# Altium PCB EVT_SYS_CARRIER.PcbDoc (part 2 of 2)
Units mil, origin at the board's own origin, x right, y up, seen from the top; angles counter-clockwise.
Board outline 3543.31 x 2755.91 mil, 4 copper layers (Top Layer, Mid-Layer 1, Mid-Layer 2, Bottom Layer), stack 63.036 mil thick; 83 components, 54 nets, 483 pads, 241 vias.
Unrouted connection lines stored in the file: 6.
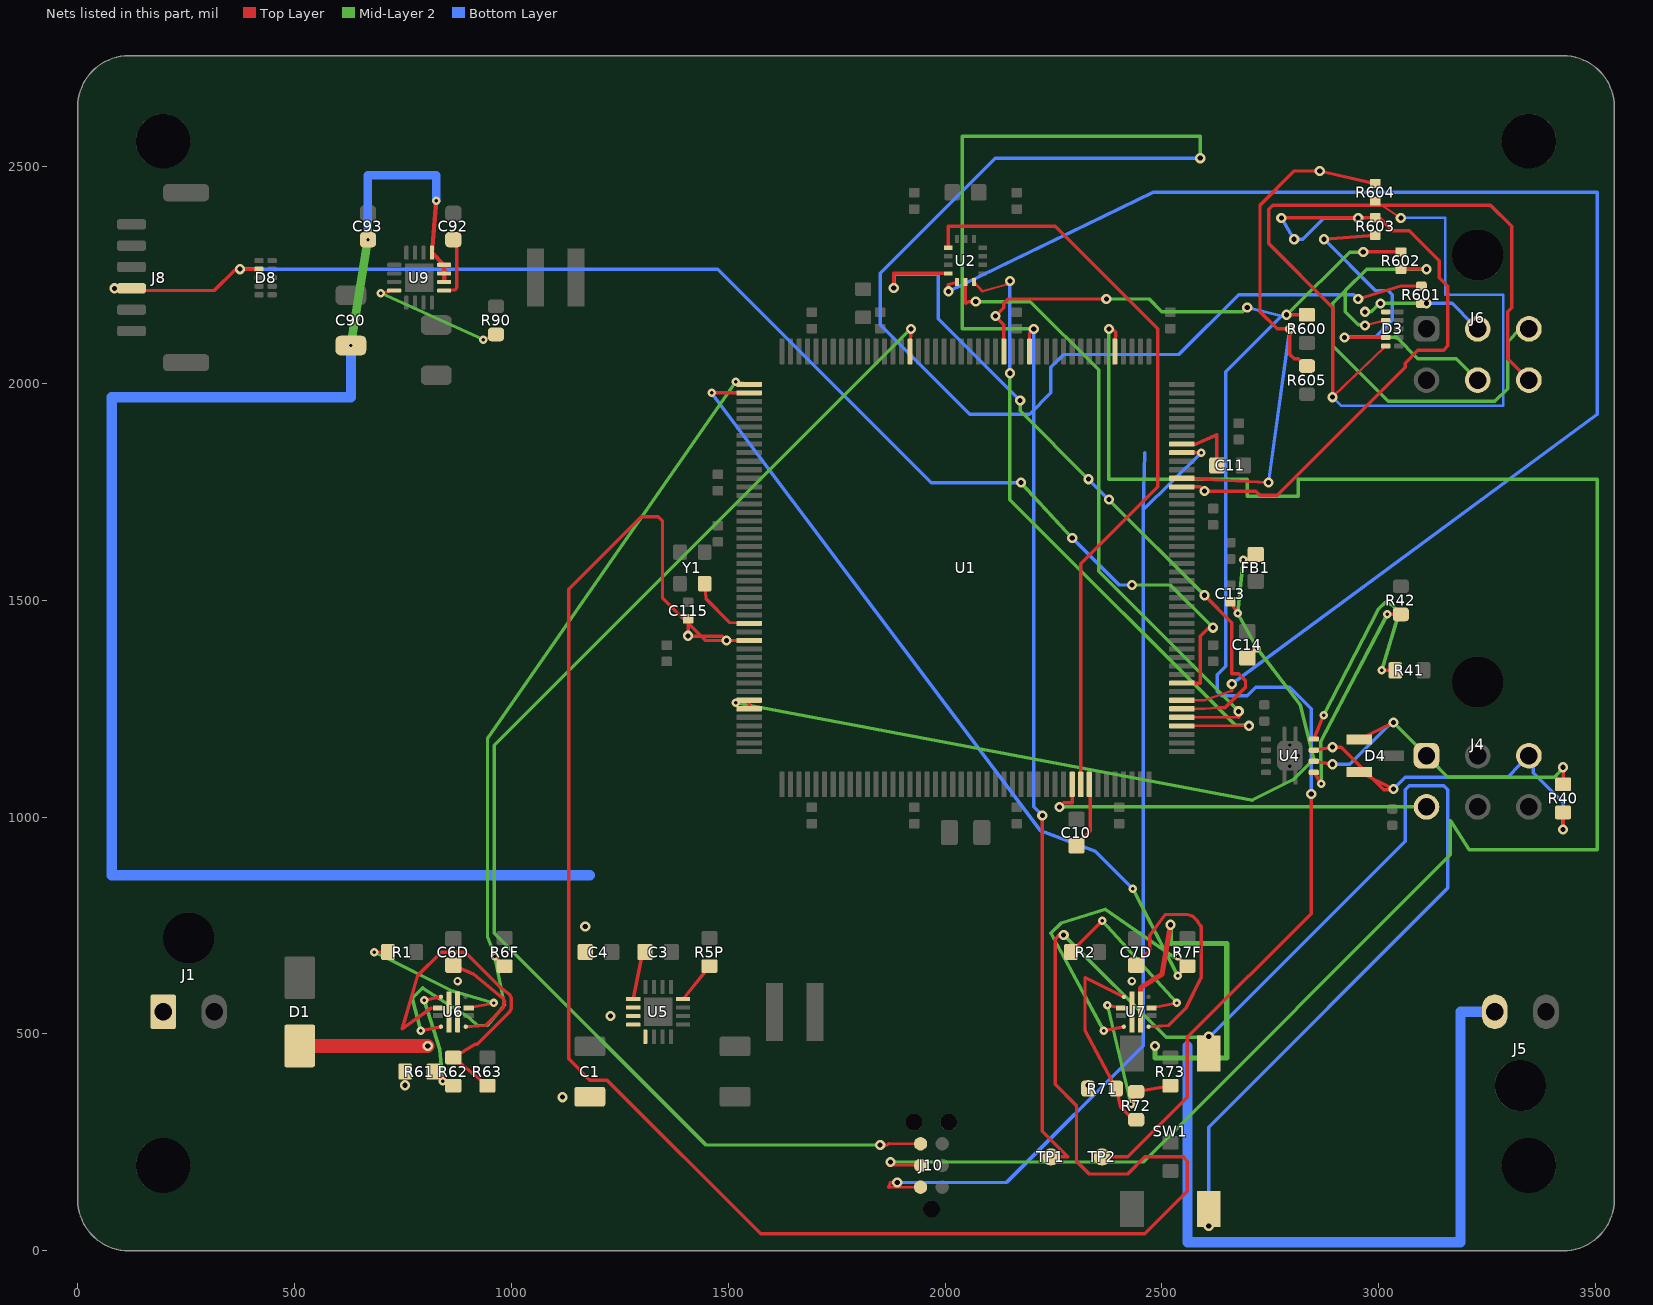
[diagram p4: the nets of this part, all layers, seen from the top]

## Via types
v1: diameter 23.62, hole 11.81, Top Layer to Bottom Layer, 103 vias
v2: diameter 15.75, hole 7.87, Top Layer to Bottom Layer, 96 vias
v3: diameter 19.68, hole 7.87, Top Layer to Bottom Layer, 33 vias
v4: diameter 19.68, hole 9.84, Top Layer to Bottom Layer, 4 vias
v5: diameter 15.75, hole 7.87, Top Layer to Mid-Layer 1, 2 vias
v6: diameter 31.5, hole 15.75, Top Layer to Bottom Layer, 2 vias
v7: diameter 11.81, hole 7.09, Top Layer to Mid-Layer 1, 1 vias

## Nets (pads, with @x,y where several pads share a name; then routed paths per layer and width w, separated by ;. In a path a pad name is that pad's centre, name@x,y a point inside that pad or via, vN(x,y) a via of type N, cw(c..) or ccw(c..) an arc to the next point about the centre after c; other vN are vias at no path point) (continued)
GNSS_TX_EXT: D8.2 J8.3 U1.97 | length 3171.7
  Top Layer w7.87: J8.3@124.02,2219.49 v1(84.65,2219.49) 98.43,2214.57 314.96,2214.57 364.17,2263.78 v1(374.02,2263.78) D8.2@417.91,2263.78 ; U1.97@2546.26,1309.06 2588.58,1309.06 2588.58,1417.32 2608.27,1437.01 v1(2618.11,1437.01)
  Mid-Layer 2 w7.87: v1(2175.2,1771.65) v1(2293.31,1643.7) ; v1(2431.1,1535.43) 2519.68,1535.43 2608.27,1446.85 v1(2618.11,1437.01)
  Bottom Layer w7.87: v1(374.02,2263.78) 383.86,2263.78 1476.38,2263.78 1968.5,1771.65 2165.35,1771.65 v1(2175.2,1771.65) ; v1(2293.31,1643.7) 2401.57,1535.43 v1(2431.1,1535.43)
HOST_UART1_RX: R600.2 R602.2 TP2.1 U1.150 | length 3629.4
  Top Layer w7.87: U1.150@2135.83,2073.82 2135.83,2086.61 2135.83,2135.83 v1(2116.14,2155.51) 2135.83,2175.2 2135.83,2185.04 2145.67,2194.88 v1(2372.05,2194.88) ; TP2.1@2362.2,216.54 2401.57,216.54 2411.42,216.54 2421.26,216.54 2559.06,354.33 2559.06,492.13 2844.49,777.56 v1(2844.49,1053.15) ; v1(2787.4,2158.46) R600.2@2834.65,2158.46 ; v1(2964.57,2303.54) R602.2@3051.18,2303.54
  Mid-Layer 2 w7.87: v1(2372.05,2194.88) 2470.47,2194.88 2500,2165.35 2687.01,2165.35 v1(2696.85,2175.2) ; v1(2787.4,2158.46) 2795.28,2165.35 2933.07,2303.15 2952.76,2303.15 v1(2964.57,2303.54)
  Bottom Layer w7.87: v1(2696.85,2175.2) 2775.59,2155.51 ; v1(2844.49,1053.15) 2844.49,1062.99 2844.49,1250 2795.28,1299.21 2716.54,1299.21 2696.85,1279.53 2637.8,1279.53 2627.95,1289.37 2627.95,1328.74 2647.64,1348.43 2647.64,2027.56 2775.59,2155.51 ; 2775.59,2155.51 v1(2787.4,2158.46) 2775.59,2155.51
HOST_UART1_RX_EXT: D3.2 J6.3 R602.1 | length 1403.1
  Top Layer w5.91: v1(2968.5,2133.86) D3.2@3016.34,2145.67 ; R602.1@3051.18,2263.39 v1(3110.24,2263.39)
  Mid-Layer 2 w7.87: v1(2968.5,2133.86) 2962.6,2135.83 2952.76,2135.83 2923.23,2165.35 2923.23,2214.57 2972.44,2263.78 ; J6.3@3336.61,2135.83 3326.77,2125.98 3297.24,2096.46 3297.24,1988.19 3267.72,1958.66 3021.65,1958.66 2893.7,2086.61 2893.7,2185.04 2972.44,2263.78 ; 2972.44,2263.78 v1@3100.39,2263.78 ; 2972.44,2263.78 v1@3100.39,2263.78 ; v1@3100.39,2263.78 v1(3110.24,2263.39) v1@3100.39,2263.78
HOST_UART1_TX: R601.2 TP1.1 U1.147 | length 5704
  Top Layer w7.87: U1.147@2194.88,2073.82 2194.88,2116.14 v1(2204.72,2125.98) ; v1(2224.41,1003.94) 2224.41,275.59 2273.62,226.38 2283.46,216.54 TP1.1@2244.09,216.54 ; v1(2952.76,2194.88) 3051.18,2224.8 R601.2@3098.43,2224.8
  Mid-Layer 2 w7.87: v1(2204.72,2125.98) 2039.37,2125.98 2039.37,2570.08 2588.58,2570.08 v1(2588.58,2519.68)
  Bottom Layer w7.87: v1(2204.72,2125.98) 2204.72,2116.14 2204.72,1023.62 2214.57,1013.78 v1(2224.41,1003.94) ; v1(2588.58,2519.68) 2116.14,2519.68 1850.39,2253.94 1850.39,2135.83 2057.09,1929.13 2194.88,1929.13 2244.09,1978.35 2244.09,2037.4 2273.62,2066.93 2539.37,2066.93 2677.17,2204.72 2942.91,2204.72 v1(2952.76,2194.88)
HOST_UART1_TX_EXT: D3.1 J6.2 R601.1 | length 289.6
  Top Layer w7.87: R601.1@3098.43,2184.65 v1(3110.24,2185.04)
  Mid-Layer 2 w7.87: v1(2968.5,2165.35) 2982.28,2165.35 2992.13,2175.2 v1(3003.94,2184.65) 3011.81,2185.04 v1(3110.24,2185.04)
  Bottom Layer w7.87: v1(3110.24,2185.04) 3169.29,2185.04 J6.2@3218.5,2135.83
HOST_UART2_RX: R604.2 R605.2 U1.121 | length 1299.4
  Top Layer w7.87: U1.121@2546.26,1781.5 v1(2746.06,1771.65) ; R605.2@2834.65,2040.35 2824.8,2047.24 2814.96,2057.09 2805.12,2057.09 2795.28,2066.93 2795.28,2116.14 v1(2795.28,2125.98) 2785.43,2125.98 2765.75,2125.98 2726.38,2165.35 2726.38,2411.42 2805.12,2490.16 2854.33,2490.16 v1(2864.17,2490.16) R604.2@2992.13,2461.02
  Bottom Layer w7.87: v1(2746.06,1771.65) v1(2795.28,2125.98)
HOST_UART2_RX_EXT: D3.5 J6.6 R604.1 | length 2770.7
  Top Layer w5.91: v1(2893.7,1968.5) D3.5@3016.34,2086.61 ; R604.1@2992.13,2420.87 v1(3051.18,2381.89)
  Top Layer w7.87: v1(2893.7,1968.5) 2893.7,1978.35 2893.7,2175.2 2746.06,2322.83 2746.06,2401.57 2755.91,2411.42 3257.87,2411.42 3307.09,2362.2 3307.09,2175.2 3297.24,2165.35 3297.24,2057.09 3336.61,2017.72 J6.6@3346.46,2007.87
  Bottom Layer w5.91: v1(2893.7,1968.5) 2913.39,1948.82 3153.54,1948.82 3287.4,1948.82 3287.4,2204.72 3153.54,2204.72 3153.54,2381.89 v1(3051.18,2381.89)
HOST_UART2_TX: R603.2 U1.120 | length 1644.5
  Top Layer w7.87: U1.120@2546.26,1761.81 2588.58,1761.81 v1(2598.43,1751.97) 2608.27,1751.97 2716.54,1751.97 2726.38,1742.13 2765.75,1742.13 3061.02,2037.4 3061.02,2047.24 3090.55,2076.77 3149.61,2076.77 3159.45,2086.61 3159.45,2224.41 3139.76,2244.09 3139.76,2283.46 3070.87,2352.36 3031.5,2352.36 3001.97,2381.89 2785.43,2381.89 v1(2775.59,2381.89) ; v1(2952.76,2381.89) R603.2@2992.13,2382.28
  Bottom Layer w7.87: v1(2775.59,2381.89) v1(2805.12,2332.68) 2814.96,2332.68 2824.8,2332.68 2874.02,2381.89 2942.91,2381.89 v1(2952.76,2381.89)
HOST_UART2_TX_EXT: D3.4 J6.5 R603.1 | length 943.6
  Top Layer w7.87: v1(2874.02,2332.68) R603.1@2992.13,2342.13 ; v1(2921.26,2106.3) D3.4@3016.34,2106.3
  Mid-Layer 2 w7.87: v1(2921.26,2106.3) 2933.07,2106.3 3041.34,2106.3 3090.55,2057.09 3179.13,2057.09 3208.66,2027.56 J6.5@3218.5,2017.72
  Bottom Layer w7.87: v1(2874.02,2332.68) 2992.13,2214.57 3021.65,2214.57 3031.5,2204.72 3031.5,2145.67 2992.13,2106.3 2933.07,2106.3 v1(2921.26,2106.3)
IMU_DRDY: U1.80 U2.4 | length 1752.9
  Top Layer w7.87: U2.4@2007.87,2312.99 2007.87,2362.2 2253.94,2362.2 2490.16,2125.98 2490.16,1761.81 2312.99,1584.65 U1.80@2312.99,1075.79
IMU_MISO: U1.94 U2.1 | length 1714.6
  Top Layer w5.91: U1.94@2546.26,1250 2598.43,1250 2629.92,1251.97
  Top Layer w7.87: v1(1881.89,2220.47) 1881.89,2253.94 U2.1@2007.38,2253.94 ; v1(2598.43,1511.81) 2661.42,1448.82 2661.42,1330.71 2677.17,1330.71 2692.91,1314.96 2692.91,1299.21 2645.67,1251.97 2629.92,1251.97
  Mid-Layer 2 w7.87: v1(2173.23,1960.63) 2173.23,1937.01 v1(2330.71,1779.53) ; v1(2377.95,1732.28) v1(2598.43,1511.81)
  Bottom Layer w7.87: v1(1881.89,2220.47) 1881.89,2251.97 1984.25,2251.97 1984.25,2181.1 1984.25,2149.61 v1(2173.23,1960.63) ; v1(2330.71,1779.53) v1(2377.95,1732.28)
IMU_MOSI: U1.95 U2.14 | length 3278.1
  Top Layer w5.91: U1.95@2546.26,1269.68 2598.43,1269.68 2661.42,1291.34
  Top Layer w7.87: v1(2007.87,2212.6) 2007.87,2228.35 U2.14@2027.56,2233.76 ; 2661.42,1291.34 v1(2661.42,1307.09)
  Bottom Layer w7.87: v1(2007.87,2212.6) 2480.32,2440.94 3307.09,2440.94 3503.94,2440.94 3503.94,1929.13 v1(2661.42,1307.09)
IMU_NSS: U1.92 U2.12 | length 1522.3
  Top Layer w5.91: U2.12@2066.93,2233.76 2086.61,2212.6 v1@2141.73,2228.35 ; U1.92@2546.26,1210.63 2598.43,1210.63 v1(2700.79,1210.63)
  Top Layer w7.87: v1@2141.73,2228.35 v1(2149.61,2236.22)
  Mid-Layer 2 w7.87: v1(2149.61,2023.62) 2149.61,1732.28 2669.29,1212.6 v1@2700.79,1212.6
  Bottom Layer w7.87: v1(2149.61,2023.62) v1(2149.61,2236.22)
IMU_SCK: U1.93 U2.13 | length 1487.8
  Top Layer w5.91: U1.93@2546.26,1230.31 2598.43,1230.32 2677.17,1230.32
  Top Layer w7.87: U2.13@2047.24,2233.76 2047.24,2185.04 2055.12,2188.98 v1(2070.87,2188.98) ; 2677.17,1230.32 v1(2677.17,1244.09)
  Mid-Layer 2 w7.87: v1(2070.87,2188.98) 2196.85,2188.98 2354.33,2031.5 2354.33,1566.93 v1(2677.17,1244.09)
MCU_HSE_25M: U1.29 Y1.3 | length 156.9
  Top Layer w7.87: Y1.3@1445.87,1538.39 1448.82,1503.94 1503.94,1448.82 U1.29@1548.23,1446.85
NRST: C115.1 SW1.1 U1.31 | length 7001.4
  Top Layer w7.87: C115.1@1407.48,1457.48 v1(1407.48,1418.11) 1417.32,1417.32 1486.22,1417.32 v1(1496.06,1407.48) ; U1.31@1548.23,1407.48 v1(1496.06,1407.48) ; v1(2273.62,728.35) 2263.78,728.35 2253.94,718.5 2253.94,383.86 2303.15,334.65 2303.15,206.69 2332.68,177.17 2421.26,177.17 2460.63,216.54 2549.21,216.54 2559.06,206.69 2559.06,137.8 2460.63,39.37 1574.8,39.37 1220.47,393.7 1181.1,393.7 1131.89,442.91 1131.89,1525.59 1299.21,1692.91 1338.58,1692.91 1348.43,1683.07 1348.43,1505.91 1446.85,1407.48 1486.22,1407.48 v1(1496.06,1407.48)
  Mid-Layer 2 w7.87: v1(2273.62,728.35) 2509.84,492.13 2598.43,492.13 v1(2608.27,494.09)
  Bottom Layer w7.87: v1(2608.27,57.09) 2608.27,68.9 2608.27,285.43 3159.45,836.61 3159.45,1062.99 3149.61,1072.83 3070.87,1072.83 3061.02,1062.99 3061.02,944.88 2618.11,501.97 v1(2608.27,494.09)
RADAR_12V: J5.1 U7.6 | length 2505
  Top Layer w11.81: 2450.79,598.43 2450.79,606.3 2500,637.8 v1(2519.68,751.97)
  Mid-Layer 2 w11.81: v1(2484.25,472.44) 2484.25,444.88 2649.61,444.88 2649.61,708.66 2519.68,708.66 v1(2519.68,751.97)
  Bottom Layer w23.62: 2559.06,472.44 2559.06,19.68 3188.98,19.68 3188.98,551.18 J5.1@3267.72,551.18
RADAR_CANH: D4.1 J4.3 R40.1 U4.7 | length 899.8
  Top Layer w7.87: U4.7@2850.39,1154.53 v1(2893.7,1161.42) 2903.54,1161.42 2913.39,1161.42 3011.81,1062.99 3021.65,1062.99 v1(3033.96,1064.96) D4.1@2955.22,1104.33 ; v1(3425.2,971.46) R40.1@3425.2,1010.83
  Mid-Layer 2 w7.87: J4.3@3336.61,1131.89 J4.3@3346.46,1141.73
  Bottom Layer w7.87: v1(3033.96,1064.96) 3041.34,1072.83 3061.02,1092.52 3297.24,1092.52 3326.77,1122.05 J4.3@3336.61,1131.89 ; J4.3@3346.46,1141.73 3356.3,1131.89 3356.3,1122.05 3356.3,1102.36 3425.2,1033.46 3425.2,984.25 v1(3425.2,971.46)
RADAR_CANL: D4.2 J4.1 R40.2 U4.6 | length 804.5
  Top Layer w7.87: U4.6@2850.39,1128.94 v1(2893.7,1122.05) ; D4.2@2955.22,1179.13 v1(3033.96,1218.5) ; R40.2@3425.2,1075.79 v1(3425.2,1115.16)
  Mid-Layer 2 w7.87: v1(3033.96,1218.5) 3041.34,1210.63 3100.39,1151.57 J4.1@3110.24,1141.73 3120.08,1131.89 3159.45,1092.52 3405.51,1092.52 3415.35,1102.36 v1(3425.2,1115.16)
  Bottom Layer w7.87: v1(2893.7,1122.05) 2903.54,1122.05 2933.07,1122.05 3021.65,1210.63 v1(3033.96,1218.5)
RADAR_EFUSE_FLT: R7F.1 U1.2 U7.4 | length 2540.6
  Top Layer w7.87: v3(1461.61,1978.35) U1.2@1548.23,1978.35 ; v3(2366.06,507.52) U7.4@2412.4,516.73 ; v3(2536.77,634.21) R7F.1@2559.06,656.5 v3(2536.77,678.78)
  Mid-Layer 2 w7.87: v3(2366.06,507.52) 2244.09,732.28 2267.72,755.91 2370.08,787.4 2527.56,677.17 v3(2536.77,678.78) ; v3(2433.07,834.65) v3(2536.77,634.21)
  Bottom Layer w7.87: v3(1461.61,1978.35) 2220.47,968.5 2346.46,921.26 v3(2433.07,834.65)
RADAR_REF: J4.4 U1.79 | length 922.4
  Top Layer w7.87: v1(2263.78,1023.62) 2273.62,1033.46 2293.31,1033.46 U1.79@2293.31,1075.79
  Mid-Layer 2 w7.87: v1(2263.78,1023.62) 3090.55,1023.62 3100.39,1023.62 J4.4@3100.39,1013.78
SHDN_PD: R42.1 U4.5 | length 491
  Top Layer w7.87: U4.5@2850.39,1103.35 v3(2867.87,1077.17) ; v3(3019.68,1467.52) R42.1@3051.18,1467.52
  Mid-Layer 2 w7.87: v3(2867.87,1077.17) 2866.14,1173.23 v3(3019.68,1467.52)
STB_PD: R41.1 U4.8 | length 569
  Top Layer w7.87: U4.8@2850.39,1180.12 v3(2872.99,1234.68) ; v3(3006.89,1338.58) R41.1@3038.39,1338.58
  Mid-Layer 2 w7.87: v3(2872.99,1234.68) 3000,1480.32 3015.75,1496.06 3031.5,1488.19 3047.24,1472.44 v3(3006.89,1338.58)
SWCLK: J10.4 U1.137 | length 4589.7
  Top Layer w5.91: v1@1870.08,196.85 J10.4@1943.5,196.85
  Top Layer w7.87: v1@1870.08,196.85 v1(1874.02,204.72) ; v1(2377.95,2125.98) 2385.83,2125.98 2393.7,2118.11 U1.137@2391.73,2073.82
  Mid-Layer 2 w7.87: v1(1874.02,204.72) 2456.69,204.72 3165.35,913.39 3165.35,992.13 3208.66,925.2 3503.94,925.2 3503.94,1779.53 2814.96,1779.53 2814.96,1740.16 2696.85,1740.16 2696.85,1779.53 2377.95,1779.53 v1(2377.95,2125.98)
SWDIO: J10.2 U1.124 | length 2530.2
  Top Layer w5.91: 1870.08,146.85 J10.2@1943.5,146.85
  Top Layer w7.87: 1870.08,146.85 1874.02,157.48 v1(1889.76,157.48) ; U1.124@2546.26,1840.55 v3(2590.55,1840.55)
  Bottom Layer w7.87: v1(1889.76,157.48) 2141.73,157.48 2456.69,472.44 2456.69,1708.66 ; v3(2590.55,1840.55) 2456.69,1708.66 ; 2456.69,1708.66 2460.63,1840.55 2456.69,1708.66
SWO: J10.6 U1.161 | length 3029.8
  Top Layer w5.91: 1870.08,246.85 J10.6@1943.5,246.85
  Top Layer w7.87: v1(1850.39,244.09) 1866.14,244.09 1870.08,246.85 ; U1.161@1919.29,2073.82 1921.26,2118.11 v1(1921.26,2125.98)
  Mid-Layer 2 w7.87: v1(1850.39,244.09) 1448.82,244.09 960.63,732.28 960.63,1165.35 v1(1921.26,2125.98)
SYS_EFUSE_FLT: R6F.1 U1.1 U6.4 | length 2081.8
  Top Layer w7.87: v3(791.26,507.52) U6.4@837.6,516.73 ; v3(961.97,678.78) R6F.1@984.25,656.5 ; v3(1517.32,2004.17) U1.1@1548.23,1998.03
  Mid-Layer 2 w7.87: v3(791.26,507.52) 771.65,582.68 795.28,606.3 905.51,535.43 921.26,519.68 944.88,519.68 984.25,566.93 v3(961.97,678.78) 944.88,724.41 944.88,1181.1 v3(1517.32,2004.17)
U5_PG: R5P.1 U5.4 | length 97
  Top Layer w7.87: U5.4@1396.16,580.71 R5P.1@1456.69,656.5
U5_SS_LOCAL: C3.1 U5.9 | length 112.4
  Top Layer w7.87: U5.9@1281,580.71 1299.21,673.23 C3.1@1308.07,688.98
U6_DVDT: C6D.1 U6.7 | length 265.3
  Top Layer w7.87: C6D.1@866.14,658.46 913.39,637.8 980.32,582.68 984.25,574.8 980.32,559.06 940.94,519.68 U6.7@894.68,516.73
U6_ILIM_LOCAL: R1.1 U6.9 | length 391
  Top Layer w7.87: v3(684.06,688.98) R1.1@715.55,688.98 ; U6.9@901.57,560.04 v3(959.49,571.57)
  Mid-Layer 2 w7.87: v3(684.06,688.98) 866.14,598.43 v3(959.49,571.57)
U6_OVLO_LOCAL: R62.2 R63.1 U6.2 | length 797.7
  Top Layer w7.87: 815.35,560.04 748.03,511.81 783.46,633.86 838.58,688.98 893.7,688.98 972.44,610.24 996.06,590.55 1000,582.68 1000,559.06 996.06,551.18 921.26,476.38 917.32,476.38 R62.2@866.14,445.87 R63.1@944.88,380.91
U6_UVLO_LOCAL: R61.2 R62.1 U6.1 | length 320.1
  Top Layer w7.87: v3(798.98,577.95) U6.1@837.6,585.63 ; v3(842.17,391.1) R61.2@819.88,413.39 R62.1@866.14,380.91
  Mid-Layer 2 w7.87: v3(798.98,577.95) 834.65,464.57 v3(842.17,391.1)
U7_DVDT: C7D.1 U7.7 | length 535.9
  Top Layer w7.87: C7D.1@2440.94,658.46 2440.94,661.42 2472.44,692.91 2472.44,728.35 2507.87,775.59 2559.06,775.59 2570.87,771.65 2582.68,759.84 2590.55,748.03 2590.55,629.92 2555.12,559.06 2515.75,519.68 U7.7@2469.49,516.73
U7_ILIM_LOCAL: R2.1 U7.9 | length 417.2
  Top Layer w7.87: R2.1@2290.35,688.98 v3(2362.72,761.34) ; U7.9@2476.38,560.04 v3(2534.29,571.57)
  Mid-Layer 2 w7.87: v3(2362.72,761.34) v3(2534.29,571.57)
U7_OVLO_LOCAL: R72.2 R73.1 U7.2 | length 377.5
  Top Layer w7.87: v3(2374.61,566.18) U7.2@2405.51,560.04 ; v3(2428.9,338.03) R72.2@2440.94,367.13 R73.1@2519.68,380.91
  Mid-Layer 2 w7.87: v3(2374.61,566.18) v3(2428.9,338.03)
U7_UVLO_LOCAL: R71.2 R72.1 U7.1 | length 464.7
  Top Layer w7.87: U7.1@2412.4,585.63 2322.83,629.92 2322.83,507.87 R71.2@2394.68,374.02 2405.51,330.71 2429.13,307.09 R72.1@2440.94,302.17
U9_PG: R90.1 U9.4 | length 322.7
  Top Layer w7.87: v3(698.94,2208.43) U9.4@729.82,2214.57 ; v3(935.47,2101.14) R90.1@964.57,2113.19
  Mid-Layer 2 w7.87: v3(698.94,2208.43) v3(935.47,2101.14)
U9_SS_LOCAL: C92.1 U9.9 | length 144.2
  Top Layer w7.87: U9.9@844.98,2214.57 870.08,2216.54 874.02,2220.47 874.02,2318.9 C92.1@866.14,2331.69
VCAP1_LOCAL: C10.1 U1.81 | length 155.2
  Top Layer w7.87: C10.1@2303.15,934.06 2303.15,937.01 2334.65,968.5 2334.65,1070.87 U1.81@2332.68,1075.79
VCAP2_LOCAL: C11.1 U1.125 | length 156.2
  Top Layer w7.87: U1.125@2546.26,1860.24 2578.74,1860.24 2626.97,1881.89 C11.1@2626.97,1811.02
VDDA_FILTERED: C13.1 C14.1 FB1.2 U1.38 U1.39 | length 2040
  Top Layer w7.87: v3(1517.32,1263.54) U1.38@1548.23,1269.68 U1.39@1548.23,1250 ; C13.1@2657.48,1496.85 v3(2674.96,1470.67) ; v3(2687.44,1593.74) FB1.2@2716.54,1605.81 ; C14.1@2696.85,1367.13 v3(2719.13,1389.41)
  Mid-Layer 2 w7.87: v3(1517.32,1263.54) 2708.66,1039.37 2803.15,1086.61 2818.9,1102.36 2850.39,1133.86 2818.9,1259.84 v3(2719.13,1389.41) v3(2674.96,1470.67) v3(2687.44,1593.74)
VIN_PROTECTED: C1.1 C4.1 C90.1 C93.1 R71.1 U5.10 U5.11 U5.12 U5.13 U6.6 U7.5 U9.10 U9.11 U9.12 U9.13 | length 3686.4
  Top Layer w9.84: v3(826.77,2421.26) U9.13@816.93,2301.67 U9.12@844.98,2273.62 U9.10@844.98,2234.25
  Mid-Layer 2 w19.68: v3(629.92,2087.6) v3(669.29,2331.69)
  Bottom Layer w19.68: v3(669.29,2331.69) 669.29,2480.32 826.77,2480.32 v3(826.77,2421.26)
  Bottom Layer w23.62: v3(629.92,2087.6) 629.92,1968.5 78.74,1968.5 78.74,866.14 1181.1,866.14
  other v1: 1118.11,354.33 2329.72,381.89 1228.35,541.34 1170.28,748.03
  other v4: 875.98,622.05 2431.1,622.05
VIN_RAW: D1.1 J1.1 R61.1 U6.5 | length 295.3
  Top Layer w31.5: D1.1@511.81,472.44 v1(807.09,472.44)
  other v1: 754.92,381.89
pads on no net: D3.6 D3.7 D3.9 D3.10 D8.5 D8.6 D8.7 D8.9 D8.10 J1.Un1 J4.6 J4.Un1 J5. J6.Un1 J8.5 J8.MP J10.Un1 J10.Un2 J10.Un3 U1.3 U1.4 U1.5 U1.7 U1.8 U1.9 U1.10 U1.11 U1.12 U1.13 U1.16 U1.17 U1.18 U1.19 U1.20 U1.21 U1.24 U1.25 U1.26 U1.27 U1.28 U1.30 U1.32 U1.33 U1.34 U1.35 U1.41 U1.42 U1.43 U1.44 U1.45 U1.46 U1.47 U1.50 U1.51 U1.52 U1.53 U1.54 U1.55 U1.56 U1.57 U1.58 U1.59 U1.60 U1.63 U1.64 U1.65 U1.66 U1.67 U1.68 U1.69 U1.70 U1.73 U1.74 U1.75 U1.76 U1.77 U1.78 U1.83 U1.84 U1.85 U1.86 U1.87 U1.88 U1.89 U1.98 U1.99 U1.100 U1.101 U1.104 U1.105 U1.106 U1.107 U1.108 U1.109 U1.110 U1.111 U1.112 U1.115 U1.116 U1.117 U1.118 U1.119 U1.122 U1.123 U1.128 U1.129 U1.130 U1.131 U1.132 U1.133 U1.134 U1.138 U1.139 U1.140 U1.141 U1.144 U1.145 U1.146 U1.151 U1.152 U1.153 U1.154 U1.155 U1.156 U1.157 U1.160 U1.162 U1.163 U1.164 U1.165 U1.167 U1.168 U1.169 U1.170 U1.173 U1.174 U1.175 U1.176 U2.2 U2.3 U2.10 U2.11 U4.Un1 U4.Un2 U4.Un3 U4.Un4 U4.Un5 U5.7 U5.8 U5.Un1 U5.Un2 U5.Un3 U5.Un4 U6.3 U6.10 U6.Un1 U6.Un2 U6.Un3 U6.Un4 U7.3 U7.10 U7.Un1 U7.Un2 U7.Un3 U7.Un4 U9.7 U9.8 U9.Un1 U9.Un2 U9.Un3 U9.Un4 Y1.1

## Polygon pours and split planes (outlines as drawn)
GND on Mid-Layer 1 "EVT_GND_L2_PLANE" (solid, pour order 1): 118.11,0 cw(c118.11,118.11) 0,118.11 0,2637.8 cw(c118.11,2637.8) 118.11,2755.91 3425.2,2755.91 cw(c3425.2,2637.8) 3543.31,2637.8 3543.31,118.11 cw(c3425.2,118.11) 3425.2,0
3V3 on Mid-Layer 2 "EVT_3V3_L3_PLANE" (solid, pour order 2): 118.11,0 cw(c118.11,118.11) 0,118.11 0,2637.8 cw(c118.11,2637.8) 118.11,2755.91 3425.2,2755.91 cw(c3425.2,2637.8) 3543.31,2637.8 3543.31,118.11 cw(c3425.2,118.11) 3425.2,0

## Other copper
Top Layer:
  rectangle net GND: 905.51,537.4 931.1,545.28
  rectangle net GND: 1231.3,677.17 1267.72,700.79
  rectangle net GND: 1342.52,503.94 1371.06,533.46
  rectangle net GND: 1342.52,568.9 1371.06,598.43
  rectangle net GND: 2480.32,537.4 2505.91,545.28
  rectangle net 3V3: 2549.21,720.47 2568.9,748.03
  rectangle net 3V3: 1446.85,720.47 1466.54,748.03
  rectangle net 3V3: 974.41,720.47 994.09,748.03
  rectangle net 3V3: 1700.2,521.65 1799.21,580.71
  rectangle net 3V3: 1328.74,311.02 1515.75,320.87
  rectangle net 3V3: 1323.82,311.02 1333.66,509.84
  rectangle net 3V3: 1515.75,299.21 1700.2,358.27
  rectangle net 3V3: 1670.67,299.21 1729.72,551.18
  rectangle net BUCK_SW: 1391.73,516.93 1606.89,564.96
  rectangle net VIN_PROTECTED: 2425.2,590.55 2437.01,622.05
  rectangle net VIN_PROTECTED: 2320.87,381.89 2338.58,413.39
  rectangle net VIN_PROTECTED: 1275.59,484.25 1312.99,509.84
  rectangle net VIN_PROTECTED: 1228.35,509.84 1297.24,566.93
  rectangle net VIN_PROTECTED: 1118.11,342.52 1181.1,366.14
  rectangle net VIN_PROTECTED: 1158.46,688.98 1182.09,748.03
  rectangle net VIN_PROTECTED: 870.08,590.55 881.89,622.05
  rectangle net VIN_RAW: 852.36,482.28 860.24,511.81
  rectangle net VIN_RAW: 807.09,474.41 856.3,486.22
  rectangle net VIN_RAW: 746.06,381.89 763.78,413.39
  rectangle net VIN_RAW: 492.13,393.7 531.5,440.94
Mid-Layer 1:
  rectangle net GND: 314.96,600.39 818.9,659.45
  rectangle net GND: 809.06,629.92 848.43,728.35
  rectangle net GND: 828.74,708.66 923.23,748.03
  rectangle net GND: 903.54,629.92 942.91,728.35
  rectangle net GND: 923.23,600.39 2374.02,659.45
  rectangle net GND: 2364.17,629.92 2403.54,728.35
  rectangle net GND: 2383.86,708.66 2478.35,748.03
  rectangle net GND: 2458.66,629.92 2498.03,728.35
  rectangle net GND: 299.21,551.18 330.71,602.36
  rectangle net GND: 911.42,542.32 938.98,629.92
  rectangle net GND: 1169.29,472.44 1192.91,629.92
  rectangle net GND: 1255.91,629.92 1279.53,688.98
  rectangle net GND: 1503.94,472.44 1527.56,629.92
  rectangle net GND: 1307.09,545.28 1370.08,629.92
  rectangle net GND: 2486.22,542.32 2513.78,629.92
Mid-Layer 2:
  rectangle net 3V3: 2547.24,748.03 2570.87,952.76
  rectangle net 3V3: 1444.88,748.03 1468.5,952.76
  rectangle net 3V3: 972.44,748.03 996.06,952.76
  rectangle net 3V3: 1769.68,551.18 1828.74,952.76
  rectangle net 3V3: 984.25,923.23 3149.61,982.28
Bottom Layer:
  rectangle net RADAR_12V: 2562.99,330.71 2594.49,472.44
  rectangle net RADAR_12V: 2480.32,460.63 2578.74,484.25
  rectangle net VIN_PROTECTED: 2311.02,622.05 2334.65,850.39
  rectangle net VIN_PROTECTED: 2322.83,610.24 2431.1,633.86
  rectangle net VIN_PROTECTED: 2317.91,381.89 2341.54,850.39
  rectangle net VIN_PROTECTED: 1212.6,541.34 1244.09,850.39
  rectangle net VIN_PROTECTED: 1106.3,354.33 1129.92,850.39
  rectangle net VIN_PROTECTED: 1158.46,748.03 1182.09,850.39
  rectangle net VIN_PROTECTED: 875.98,834.65 984.25,866.14
  rectangle net VIN_PROTECTED: 860.24,622.05 891.73,850.39
  rectangle net VIN_PROTECTED: 984.25,791.34 2330.71,909.45
  rectangle net VIN_RAW: 791.34,330.71 822.83,472.44
  rectangle net VIN_RAW: 759.84,314.96 822.83,346.46
  rectangle net VIN_RAW: 181.1,330.71 212.6,551.18
  rectangle net VIN_RAW: 196.85,271.65 767.72,389.76

## Silkscreen, mask and mechanical layers (free items; w line width, h text height)
Top Overlay:
  region: 408.66,2299.61 397.64,2299.61 408.66,2310.63
  region: 703.15,2273.62 690.16,2264.17 690.16,2283.07
  region: 3007.09,2181.5 2996.06,2181.5 3007.09,2192.52
  region: 2731.89,1205.12 2722.44,1218.11 2741.34,1218.11
  region: 3357.87,1163.39 3338.98,1163.39 3348.43,1176.38
  lines w4.72: 1017.56,2159.29 1187.17,2159.29 ; 1017.56,2328.9 1187.17,2328.9 ; 2460.63,153.54 2397.64,153.54 2397.64,397.64 2460.63,397.64 ; 2578.74,153.54 2641.73,153.54 2641.73,397.64 2578.74,397.64 ; 3040.94,1126.38 3040.94,1080.32 3100.79,1080.32 3100.79,1119.69 ; 3040.94,1157.09 3040.94,1203.15 3100.79,1203.15 3100.79,1163.78 ; 3227.95,594.09 3132.48,594.09 3132.48,235.04 3171.85,195.67 3481.69,195.67 3521.06,235.04 3521.06,594.09 3411.42,594.09 ; 3307.48,594.09 3360.24,594.09
  lines w10: 90.55,2099.02 129.53,2099.02 129.53,2028.15 186.61,2028.15 ; 129.53,2389.17 129.53,2460.04 186.61,2460.04 ; 297.64,2078.15 297.64,2410.04 ; 413.39,2188.58 452.76,2188.58 ; 421.65,2299.61 452.76,2299.61 ; 594.09,2117.67 594.09,2173.67 ; 649.21,2356.67 649.21,2367.74 ; 665.75,2117.67 665.75,2173.67 ; 689.37,2356.67 689.37,2367.74 ; 724.02,2199.41 724.02,2180.71 742.72,2180.71 ; 724.02,2288.78 724.02,2307.48 742.72,2307.48 ; 790.94,2048.77 790.94,2104.77 ; 832.09,2180.71 850.79,2180.71 850.79,2199.41 ; 832.09,2307.48 850.79,2307.48 850.79,2288.78 ; 846.06,2356.67 846.06,2367.74 ; 862.6,2048.77 862.6,2104.77 ; 886.22,2356.67 886.22,2367.74 ; 944,2136.33 944,2155.01 ; 985.14,2136.33 985.14,2155.01 ; 2352.86,353.44 2371.55,353.44 ; 2352.86,394.59 2371.55,394.59 ; 2420.37,325.3 2420.37,343.99 ; 2461.52,325.3 2461.52,343.99 ; 2637.8,291.34 2633.86,291.34 2633.86,535.43 2637.8,535.43 ; 2696.85,291.34 2814.96,291.34 ; 2696.85,535.43 2814.96,535.43 ; 2722.05,1235.91 2722.05,1244.4 ; 2731.89,1086.61 2731.89,1078.35 2767.32,1078.35 ; 2743.7,1205.12 2767.72,1205.12 ; 2750.39,1235.91 2750.39,1244.4 ; 2814.07,1998.53 2814.07,2017.21 ; 2822.83,1078.35 2858.66,1078.35 2858.66,1087.01 ; 2822.83,1205.12 2858.66,1205.12 2858.66,1196.46 ; 2855.22,1998.53 2855.22,2017.21 ; 2874.02,291.34 2877.95,291.34 2877.95,535.43 2874.02,535.43 ; 3011.81,2070.47 3051.18,2070.47 ; 3017.32,995.75 3017.32,1004.25 ; 3020.08,2181.5 3051.18,2181.5 ; 3030.61,1490.66 3030.61,1509.34 ; 3045.67,995.75 3045.67,1004.25 ; 3071.75,1490.66 3071.75,1509.34 ; 3083.46,2198.68 3083.46,2210.77 ; 3113.39,2198.68 3113.39,2210.77 ; 3233.46,2183.07 3233.66,2428.74 ; 3358.86,1224.41 3358.86,864.96 3398.23,825.59 ; 3369.69,1101.97 3369.69,1100 3429.53,1100 3429.53,1139.37 ; 3369.69,1146.06 3369.69,1176.77 ; 3369.69,1220.87 3369.69,1222.83 3429.53,1222.83 3429.53,1183.46 ; 3486.81,594.09 3486.81,235.04 3526.18,195.67 ; 2965.16,1098.43 2965.16,1457.87 3004.53,1497.24 3452.17,1497.24 3491.54,1457.87 3491.54,1098.43 2965.16,1098.43 ; 2965.16,2082.68 3491.54,2082.68 3491.54,2442.13 3452.17,2481.5 3004.53,2481.5 2965.16,2442.13 2965.16,2082.68
Mechanical 1:
  lines w3.94: 0,2637.8 cw(c118.11,2637.8) 118.11,2755.91 ; 0,3031.5 cw(c118.11,3031.5) 118.11,3149.61 ; 3136.81,200 3477.36,200 3516.73,239.37 3516.73,589.76 3136.81,589.76 3136.81,239.37 ; 3425.2,0 ccw(c3425.2,118.11) 3543.31,118.11 ; 3425.2,2755.91 cw(c3425.2,2637.8) 3543.31,2637.8 ; 3818.9,0 ccw(c3818.9,118.11) 3937.01,118.11 ; 3818.9,3149.61 cw(c3818.9,3031.5) 3937.01,3031.5 ; 0,118.11 ccw(c118.11,118.11) 118.11,0 cw(c118.11,118.11) 0,118.11 ; 1023.62,2165.35 1181.1,2165.35 1181.1,2322.83 1023.62,2322.83 1023.62,2165.35 ; 2401.57,157.48 2637.8,157.48 2637.8,393.7 2401.57,393.7 2401.57,157.48 ; 3045.28,1084.65 3045.28,1198.82 3096.46,1198.82 3096.46,1084.65 3045.28,1084.65
Mechanical 4:
  lines w10: 3343.31,810.24 3343.31,1240.16 3454.72,1240.16 3454.72,1348.43 ; 3471.26,180.31 3471.26,609.84 ; 70.87,2089.37 114.17,2089.37 114.17,2012.6 177.17,2012.6 177.17,2008.66 322.83,2008.66 322.83,2087.8 312.99,2087.8 312.99,2400.39 322.83,2400.39 322.83,2479.53 177.17,2479.53 177.17,2475.59 114.17,2475.59 114.17,2398.82 70.87,2398.82 70.87,2089.37 ; 397.24,2185.04 468.9,2185.04 468.9,2303.15 397.24,2303.15 397.24,2185.04 ; 584.65,2055.12 584.65,2236.22 675.2,2236.22 675.2,2055.12 584.65,2055.12 ; 640.55,2303.94 640.55,2420.47 698.03,2420.47 698.03,2303.94 640.55,2303.94 ; 703.54,2199.61 718.5,2199.61 718.5,2175.2 742.91,2175.2 742.91,2160.24 831.89,2160.24 831.89,2175.2 856.3,2175.2 856.3,2199.61 871.26,2199.61 871.26,2288.58 856.3,2288.58 856.3,2312.99 831.89,2312.99 831.89,2327.95 742.91,2327.95 742.91,2312.99 718.5,2312.99 718.5,2288.58 703.54,2288.58 703.54,2199.61 ; 781.5,1986.22 781.5,2167.32 872.05,2167.32 872.05,1986.22 781.5,1986.22 ; 837.4,2303.94 837.4,2420.47 894.88,2420.47 894.88,2303.94 837.4,2303.94 ; 935.83,2087.4 935.83,2203.94 993.31,2203.94 993.31,2087.4 935.83,2087.4 ; 2303.94,345.28 2303.94,402.76 2420.47,402.76 2420.47,345.28 2303.94,345.28 ; 2412.2,276.38 2469.69,276.38 2469.69,392.91 2412.2,392.91 2412.2,276.38 ; 2627.95,183.07 2627.95,643.7 2883.86,643.7 2883.86,183.07 2627.95,183.07 ; 2718.11,1204.33 2754.33,1204.33 2754.33,1275.98 2718.11,1275.98 2718.11,1204.33 ; 2718.5,1064.96 2718.5,1218.5 2872.05,1218.5 2872.05,1064.96 2718.5,1064.96 ; 2805.91,1949.61 2805.91,2066.14 2863.39,2066.14 2863.39,1949.61 2805.91,1949.61 ; 2949.61,1082.68 2949.61,1512.6 3507.09,1512.6 3507.09,1082.68 3395.67,1082.68 3395.67,974.41 3061.02,974.41 3061.02,1082.68 2949.61,1082.68 ; 2949.61,2066.93 3061.02,2066.93 3061.02,1958.66 3395.67,1958.66 3395.67,2066.93 3507.09,2066.93 3507.09,2496.85 2949.61,2496.85 2949.61,2066.93 ; 2995.67,2066.93 2995.67,2185.04 3067.32,2185.04 3067.32,2066.93 2995.67,2066.93 ; 3013.39,964.17 3049.61,964.17 3049.61,1035.83 3013.39,1035.83 3013.39,964.17 ; 3022.44,1441.73 3079.92,1441.73 3079.92,1558.27 3022.44,1558.27 3022.44,1441.73 ; 3079.92,2168.11 3116.93,2168.11 3116.93,2241.34 3079.92,2241.34 3079.92,2168.11 ; 3323.62,1102.36 3364.17,1102.36 3364.17,1094.49 3435.04,1094.49 3435.04,1139.76 3475.59,1139.76 3475.59,1183.07 3435.04,1183.07 3435.04,1228.35 3364.17,1228.35 3364.17,1220.47 3323.62,1220.47 3323.62,1176.77 3364.17,1176.77 3364.17,1146.06 3323.62,1146.06 3323.62,1102.36
Mechanical 6:
  circle w10: c2755.91,413.39 r68.9
  region: 846.46,2185.04 728.35,2185.04 728.35,2273.62 757.87,2303.15 846.46,2303.15
  region: 3425.2,1104.33 3374.02,1104.33 3374.02,1205.71 3386.81,1218.5 3425.2,1218.5
  lines w10: 133.86,2101.38 161.7,2121.06 133.86,2140.75 ; 3080.71,1102.76 3110.24,1141.73 3139.76,1102.76 ; 3080.71,2087.01 3110.24,2125.98 3139.76,2087.01 ; 3363.19,1220.08 3363.19,869.29 3402.56,829.92 ; 3491.14,589.76 3491.14,239.37 3530.51,200 ; 133.86,2032.48 133.86,2455.71 293.31,2455.71 293.31,2032.48 133.86,2032.48 ; 413.39,2194.88 452.76,2194.88 452.76,2293.31 423.23,2293.31 413.39,2283.46 413.39,2194.88 ; 598.43,2082.68 598.43,2208.66 661.42,2208.66 661.42,2082.68 598.43,2082.68 ; 653.54,2330.71 653.54,2393.7 685.04,2393.7 685.04,2330.71 653.54,2330.71 ; 795.28,2013.78 795.28,2139.76 858.27,2139.76 858.27,2013.78 795.28,2013.78 ; 850.39,2330.71 850.39,2393.7 881.89,2393.7 881.89,2330.71 850.39,2330.71 ; 948.33,2114.17 948.33,2177.17 980.81,2177.17 980.81,2114.17 948.33,2114.17 ; 2330.71,357.78 2330.71,390.26 2393.7,390.26 2393.7,357.78 2330.71,357.78 ; 2424.7,303.15 2457.19,303.15 2457.19,366.14 2424.7,366.14 2424.7,303.15 ; 2637.8,295.28 2637.8,531.5 2874.02,531.5 2874.02,295.28 2637.8,295.28 ; 2726.38,1220.47 2746.06,1220.47 2746.06,1259.84 2726.38,1259.84 2726.38,1220.47 ; 2736.22,1082.68 2736.22,1181.1 2755.91,1200.79 2854.33,1200.79 2854.33,1082.68 2736.22,1082.68 ; 2818.41,1976.38 2818.41,2039.37 2850.89,2039.37 2850.89,1976.38 2818.41,1976.38 ; 2969.49,1102.76 2969.49,1453.54 3008.86,1492.91 3447.83,1492.91 3487.2,1453.54 3487.2,1102.76 2969.49,1102.76 ; 2969.49,2087.01 3487.2,2087.01 3487.2,2437.8 3447.83,2477.17 3008.86,2477.17 2969.49,2437.8 2969.49,2087.01 ; 3011.81,2076.77 3011.81,2165.35 3021.65,2175.2 3051.18,2175.2 3051.18,2076.77 3011.81,2076.77 ; 3021.65,980.32 3041.34,980.32 3041.34,1019.68 3021.65,1019.68 3021.65,980.32 ; 3034.94,1468.5 3067.42,1468.5 3067.42,1531.5 3034.94,1531.5 3034.94,1468.5 ; 3087.8,2184.05 3109.06,2184.05 3109.06,2225.39 3087.8,2225.39 3087.8,2184.05
  text "'.Designator'" at 3714.64,2646.08 h39.37 r180
  text "'.Designator'" at 3069.02,2416.52 h39.37
  text "'.Designator'" at 682.52,2298.48 h15.75 r90
  text "'.Designator'" at 879.38,2298.48 h15.75 r90
  text "'.Designator'" at 668.01,2219.38 h29.53
  text "'.Designator'" at 3107.07,2163.26 h10.24 r90
  text "'.Designator'" at 451.96,2155.78 h21.65 r90
  text "'.Designator'" at 229.93,2084.77 h39.37 r90
  text "'.Designator'" at 977.8,2081.94 h15.75 r90
  text "'.Designator'" at 3050.38,2037.67 h21.65 r90
  text "'.Designator'" at 656.39,2018.21 h31.5 r90
  text "'.Designator'" at 853.24,2018.21 h31.5 r90
  text "'.Designator'" at 2847.88,1944.15 h15.75 r90
  text "'.Designator'" at 3064.41,1436.27 h15.75 r90
  text "'.Designator'" at 3069.02,1432.27 h39.37
  text "'.Designator'" at 2744.59,1200.23 h9.84 r90
  text "'.Designator'" at 2683.95,1118.77 h27.56
  text "'.Designator'" at 3423.51,1046.63 h28.35 r90
  text "'.Designator'" at 3039.87,960.07 h9.84 r90
  text "'.Designator'" at 3781.37,890.56 h39.37 r180
  text "'.Designator'" at 2298.48,360.78 h15.75
  text "'.Designator'" at 2454.18,270.92 h15.75 r90
  text "'.Designator'" at 3840.42,260.64 h39.37 r180
  text "'.Designator'" at 2788.99,254.06 h39.37 r90
Mechanical 15:
  lines w1.97: 1013.39,2155.12 1191.34,2155.12 1191.34,2333.07 1013.39,2333.07 1013.39,2155.12 ; 2391.73,45.28 2647.64,45.28 2647.64,505.91 2391.73,505.91 2391.73,45.28 ; 2994.88,1074.8 2994.88,1208.66 3146.85,1208.66 3146.85,1074.8 2994.88,1074.8 ; 3116.93,180.31 3116.93,609.84 3536.61,609.84 3536.61,180.31 3116.93,180.31

## Text inside footprints (layer, text, board x,y; h text height)
J10: Mechanical 7 "KEEPOUT" at 1979.13,147.2 h15.75 r90